# Altium PCB flight_controller.PcbDoc (part 1 of 2)
Units mm, origin at the board's own origin, x right, y up, seen from the top; angles counter-clockwise.
Board outline 59.18 x 59.23 mm, 4 copper layers (L1 (SIG), L2 (GND), L3 (PWR), L4 (SIG)), stack 1.586 mm thick; 122 components, 85 nets, 425 pads, 276 vias.
Unrouted connection lines stored in the file: 18.
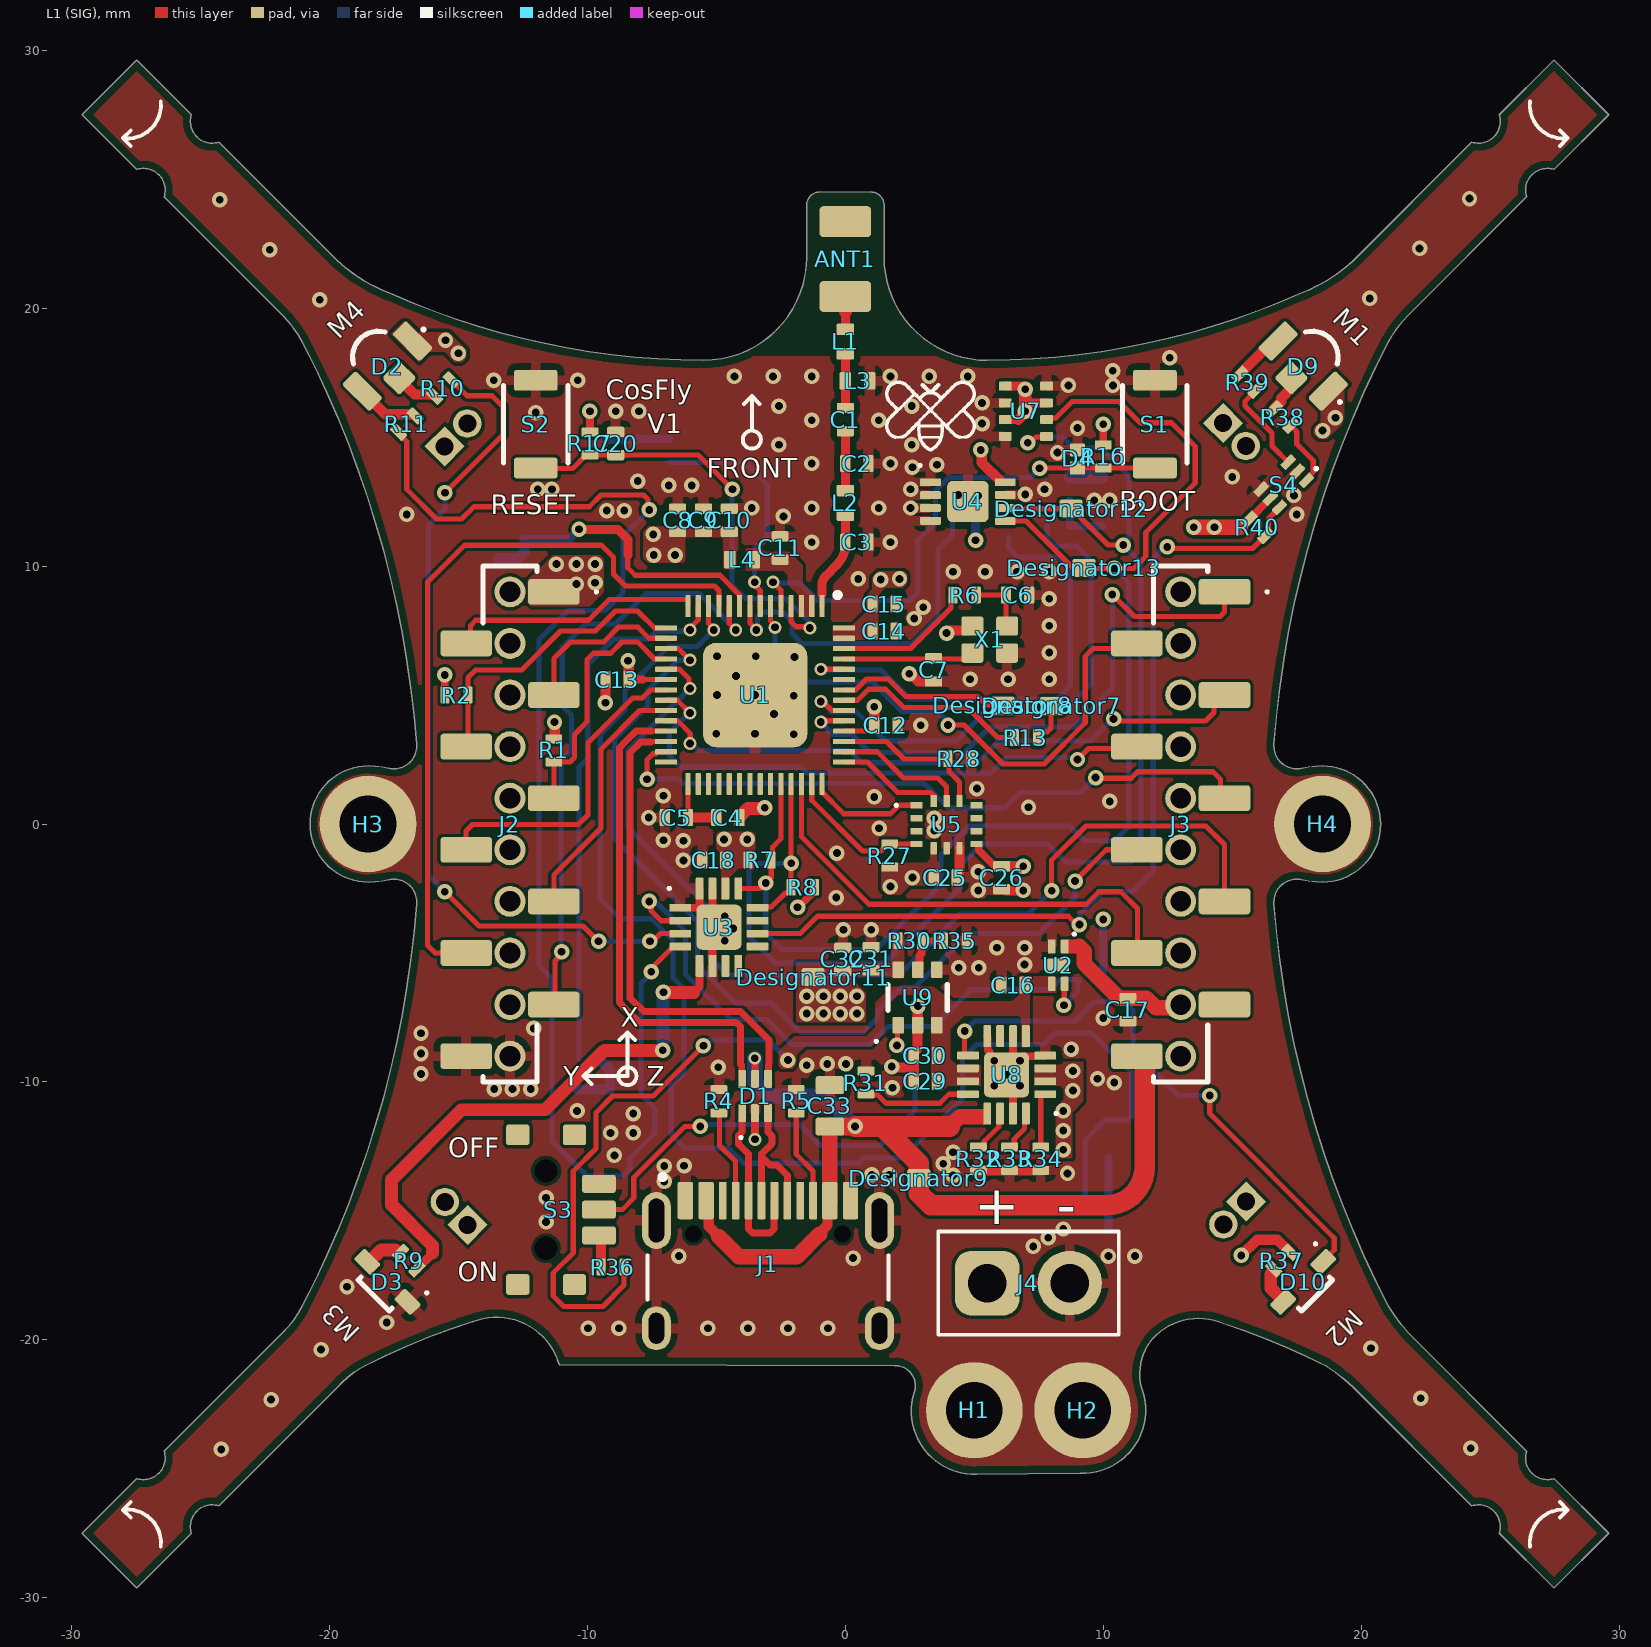
[diagram p0: L1 (SIG) view]
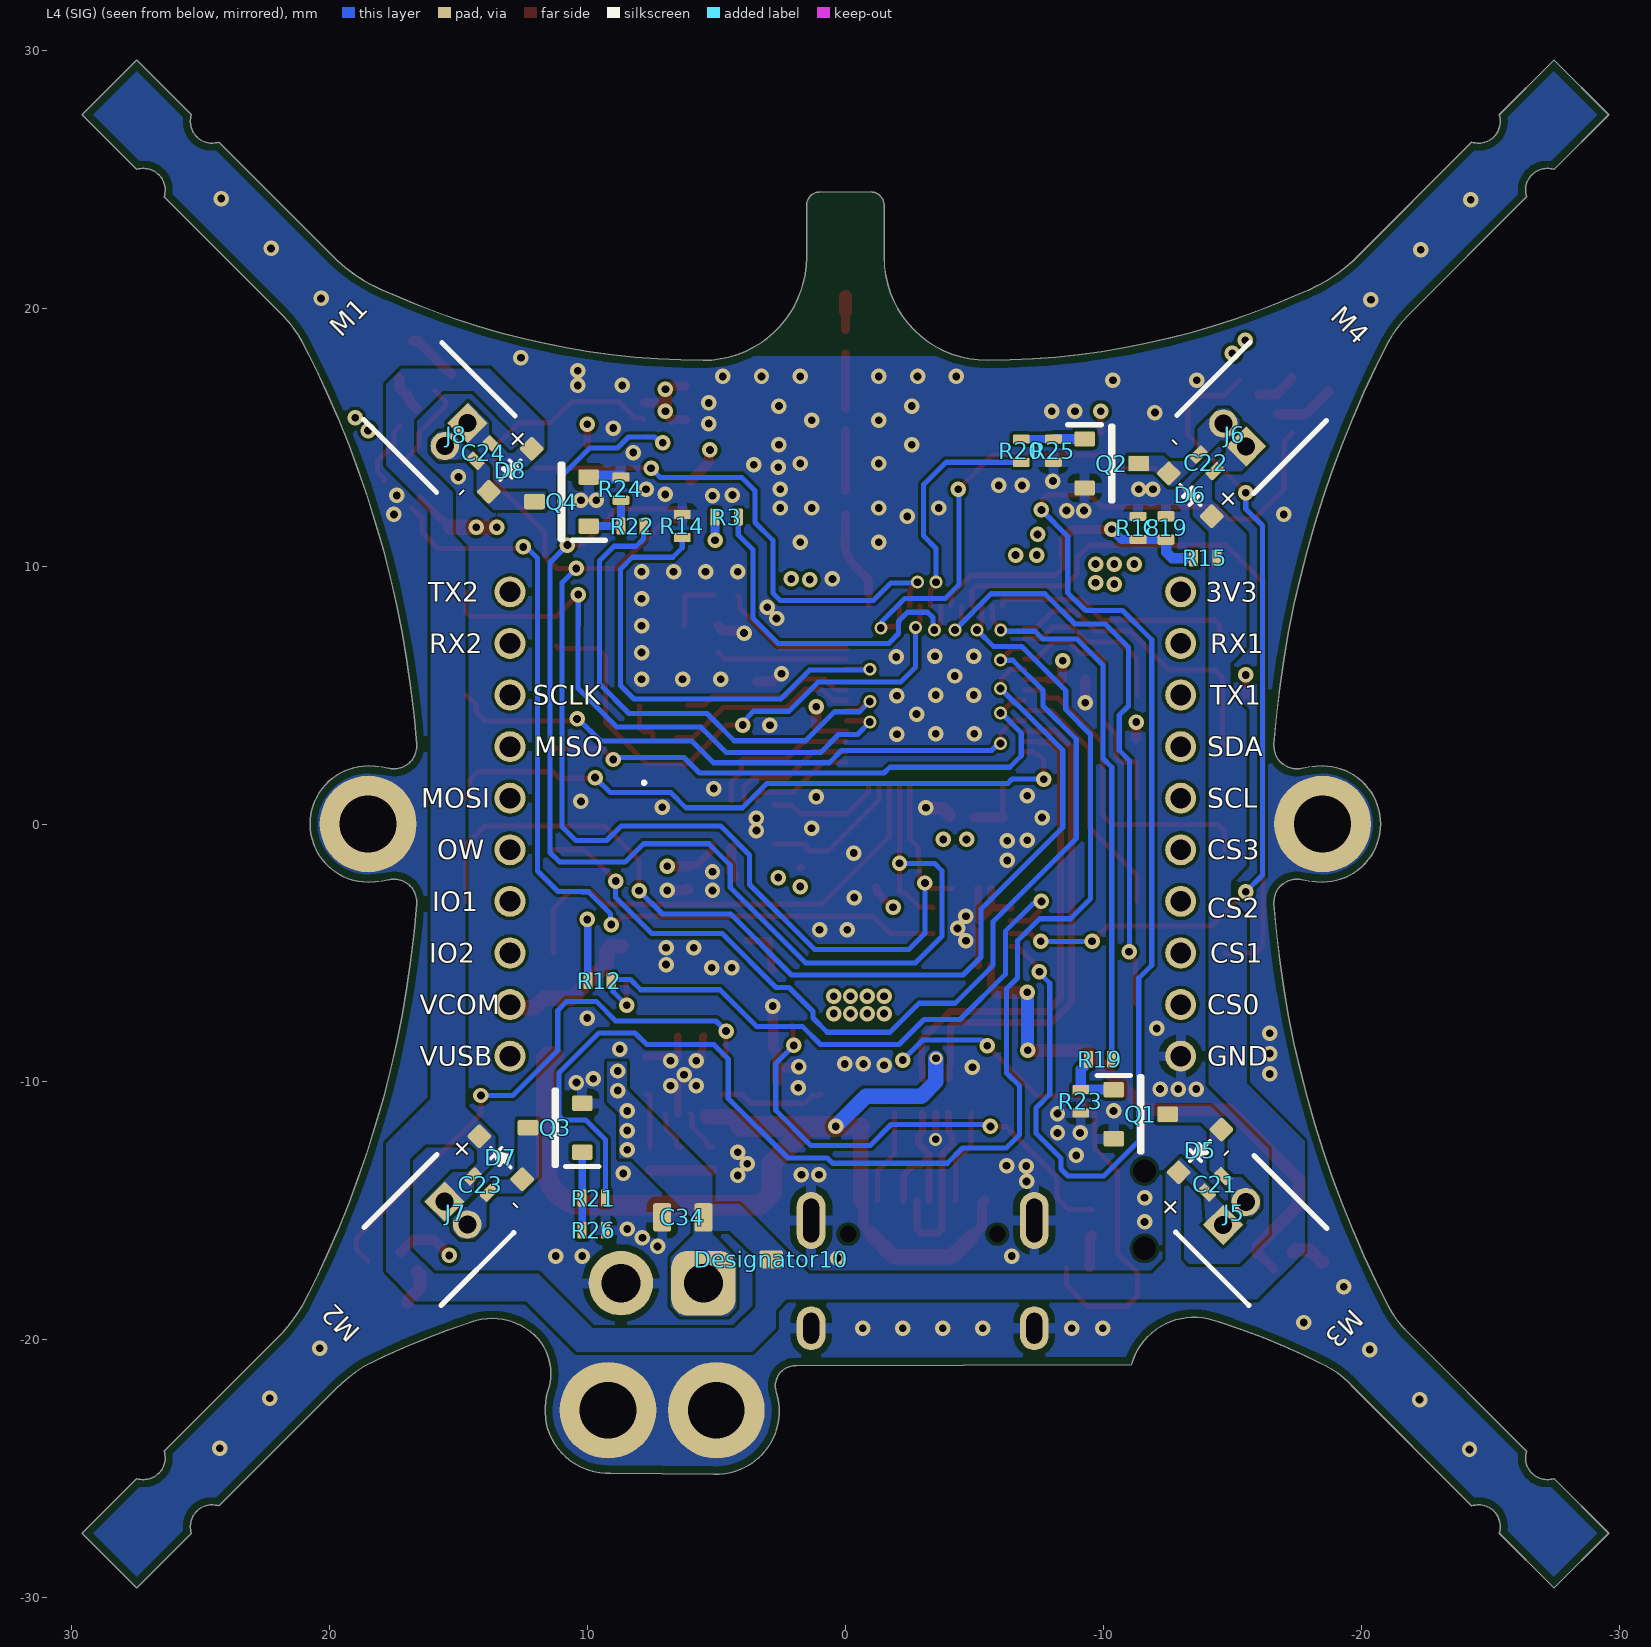
[diagram p1: L4 (SIG) view, seen from below]
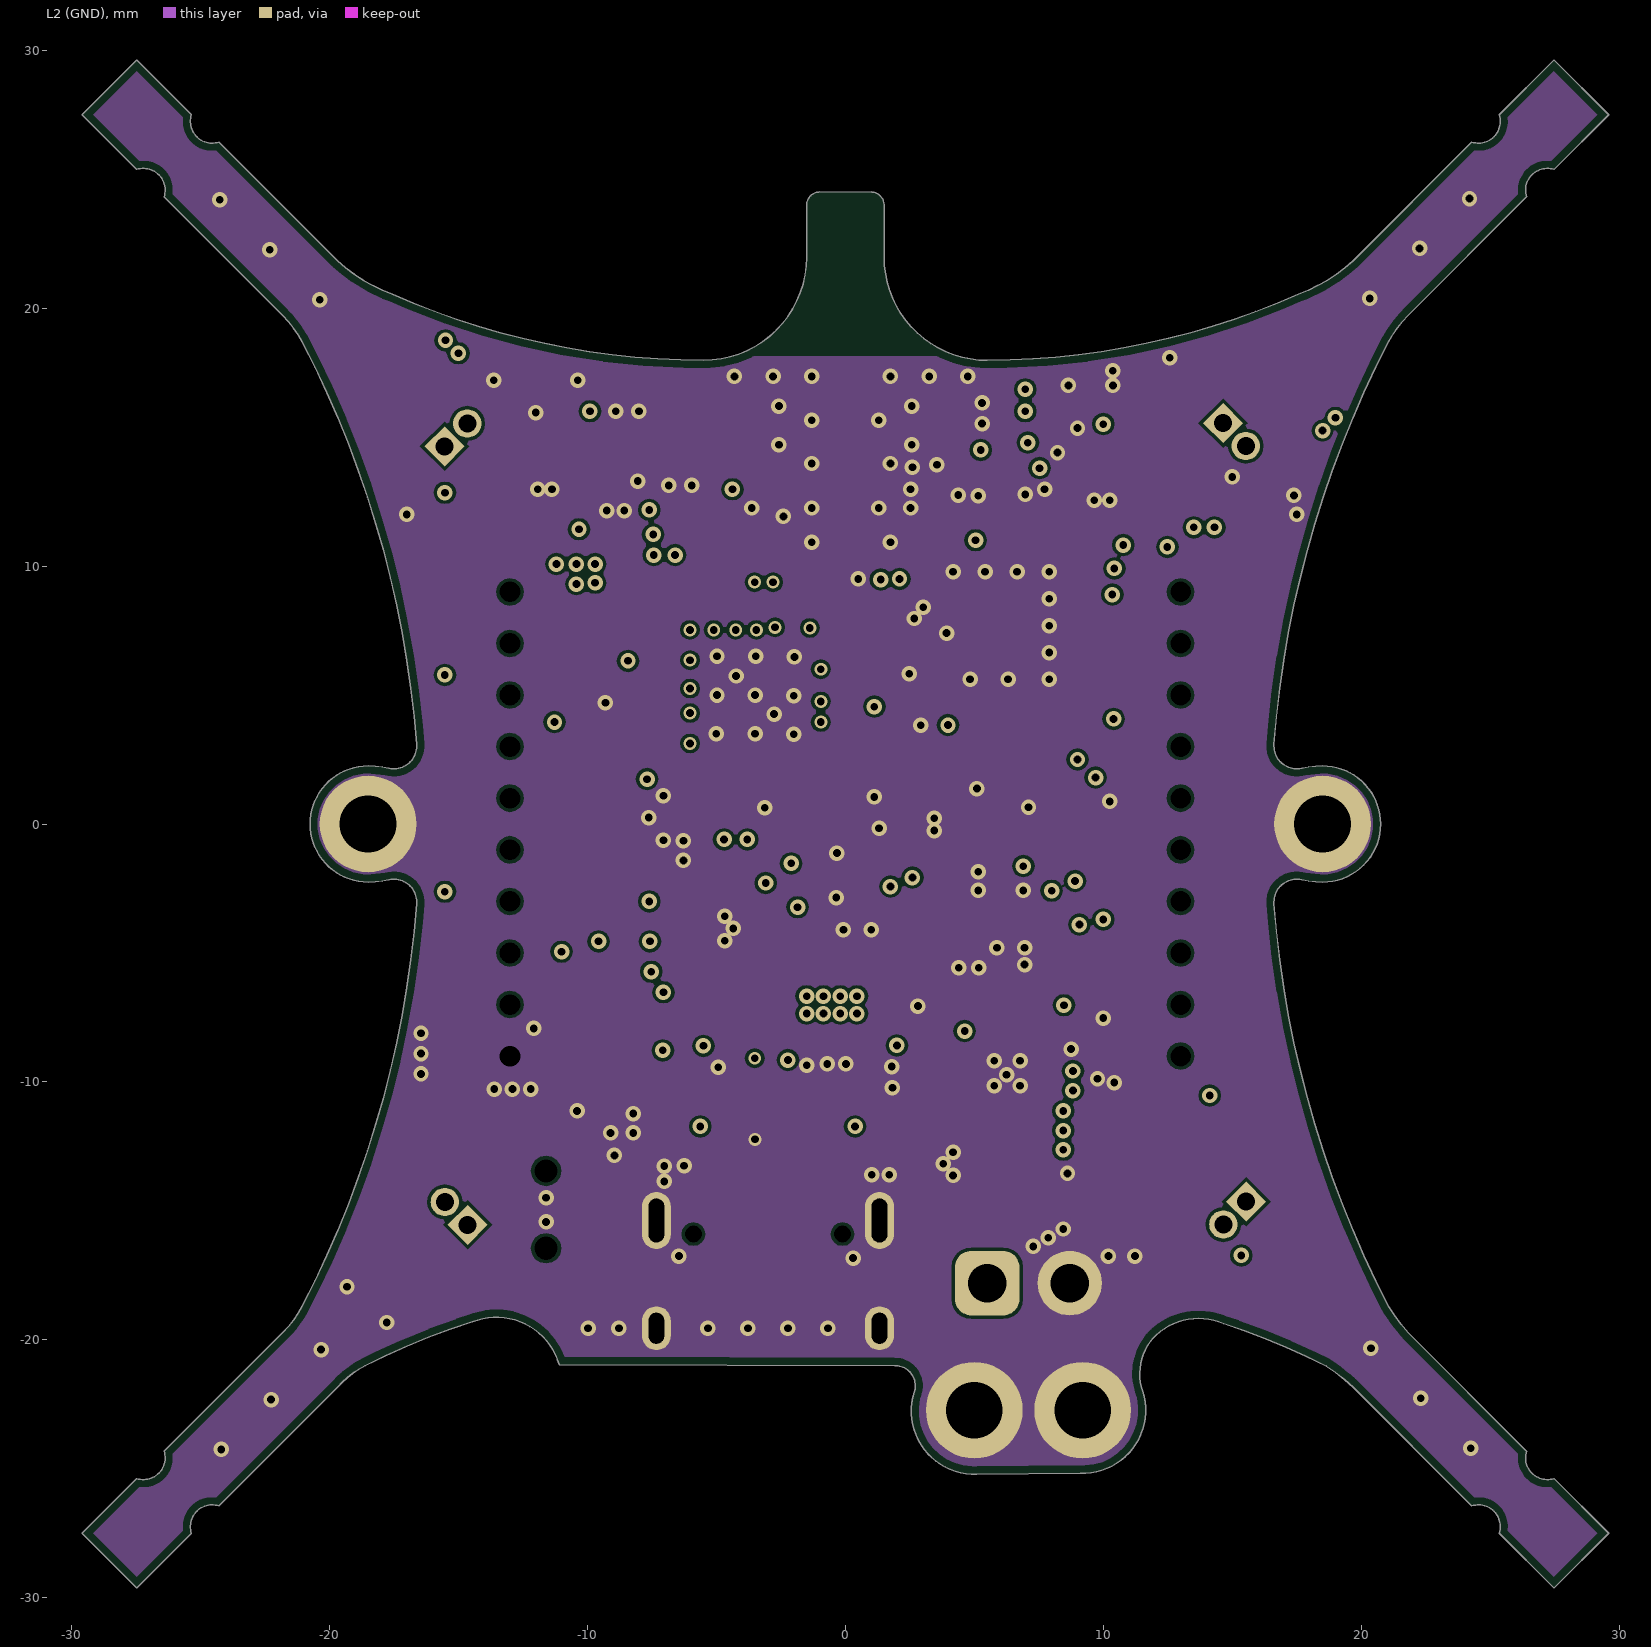
[diagram p2: L2 (GND)]
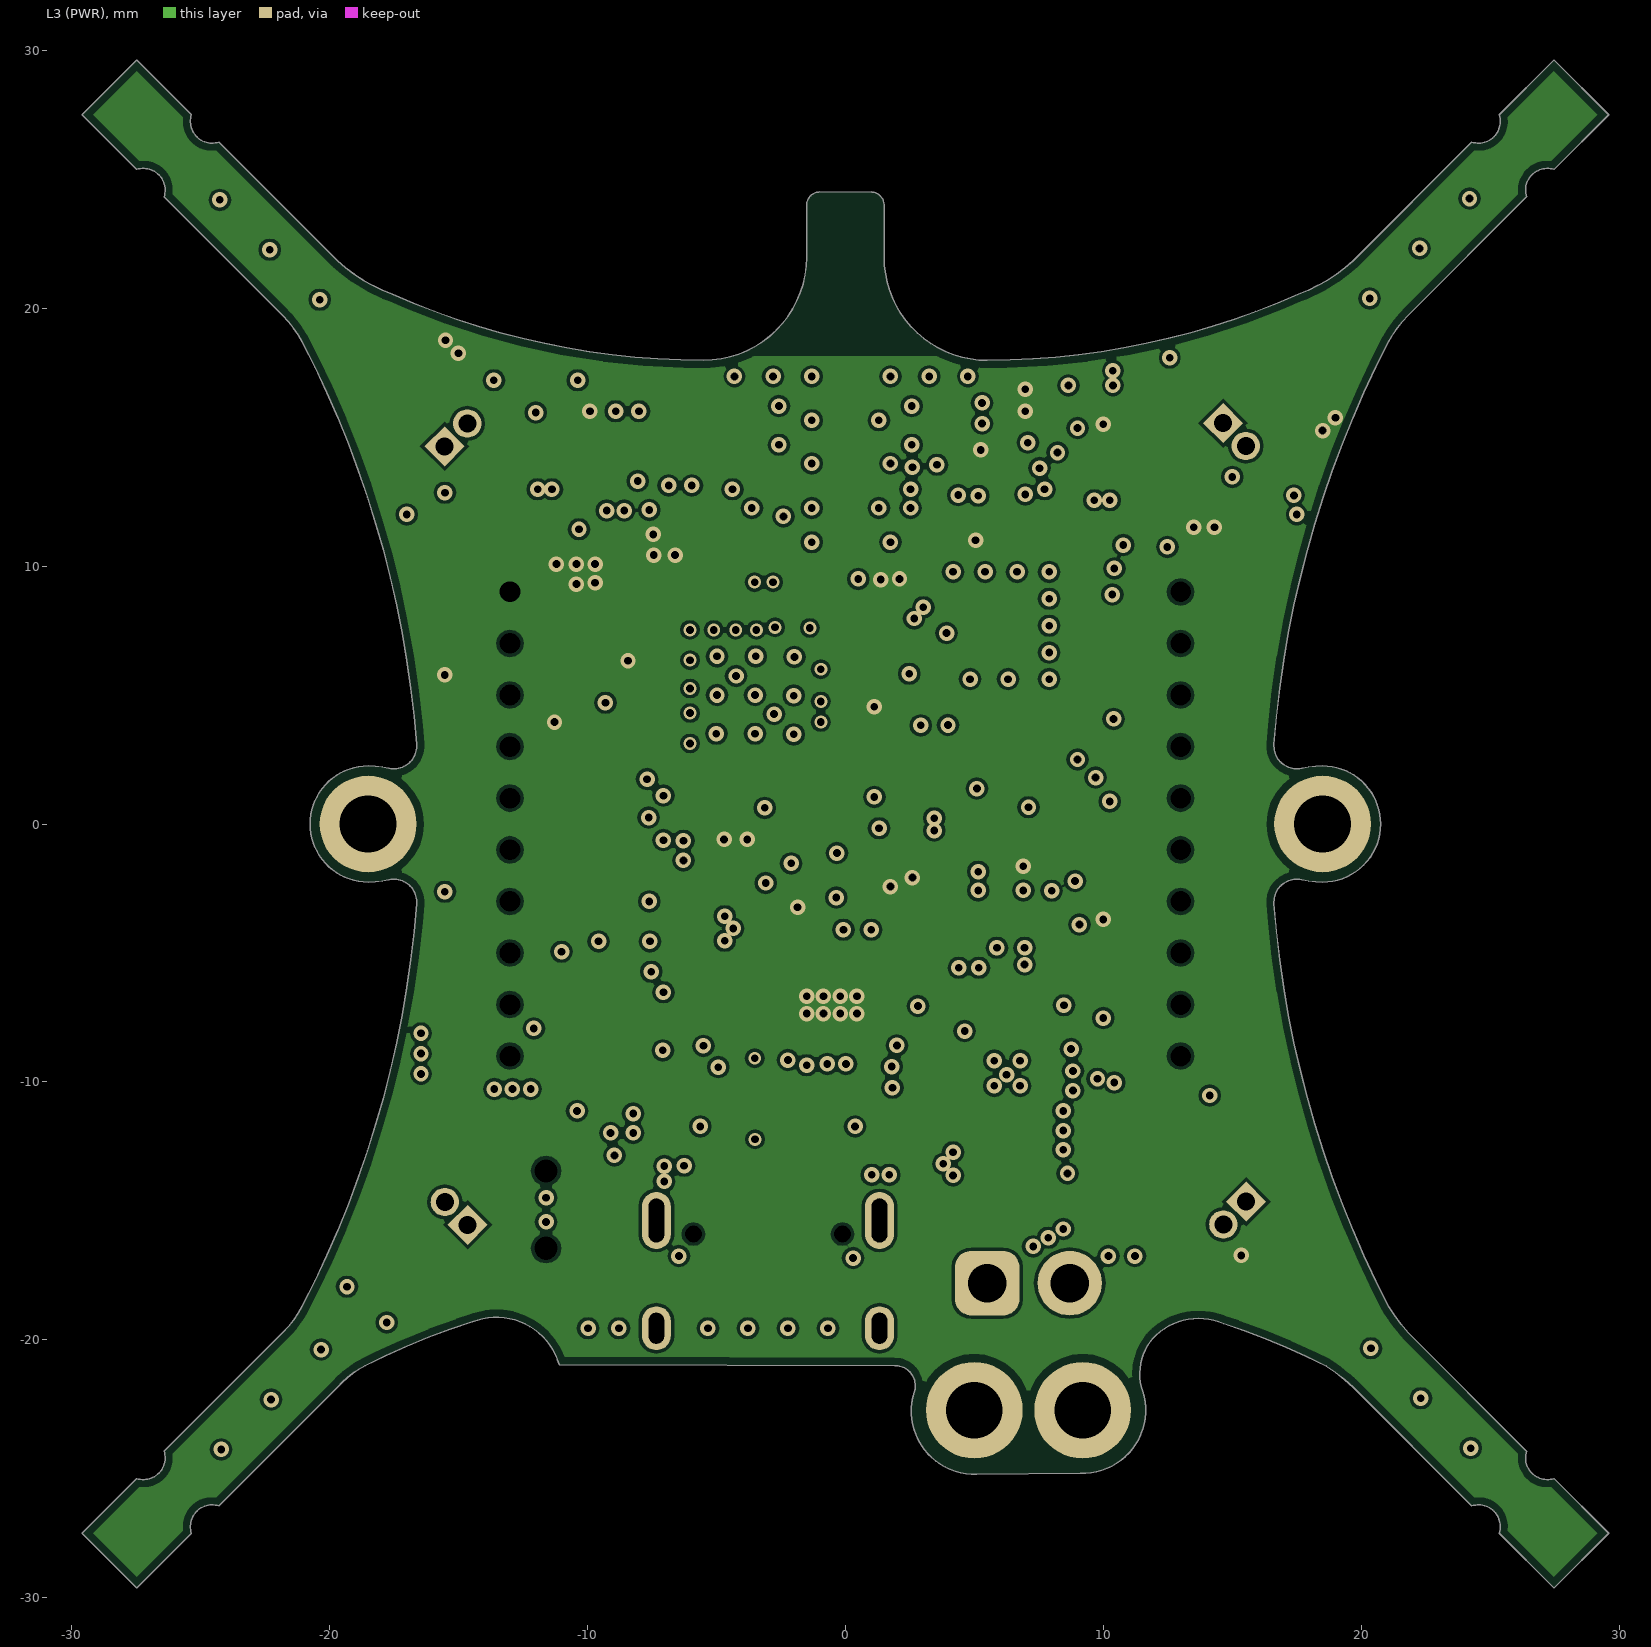
[diagram p3: L3 (PWR)]
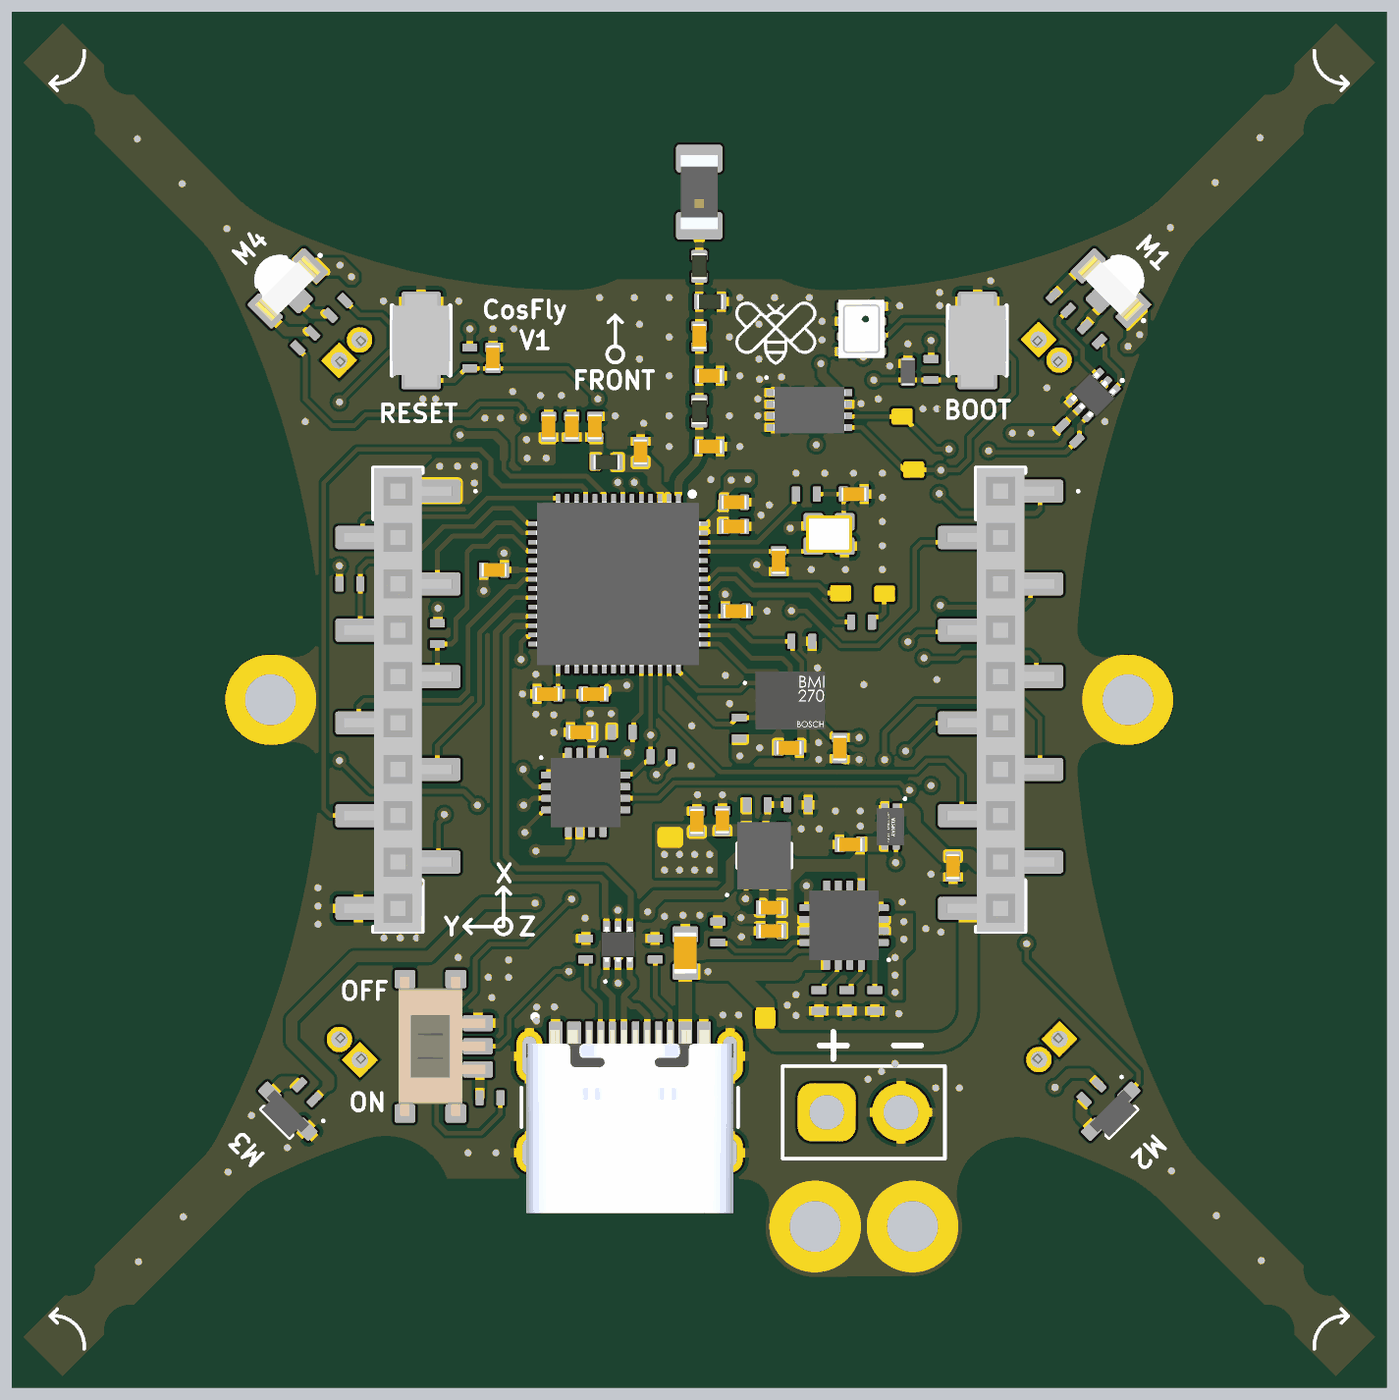
[diagram p5: 3D render of the assembled board from above, using the file's embedded part models]
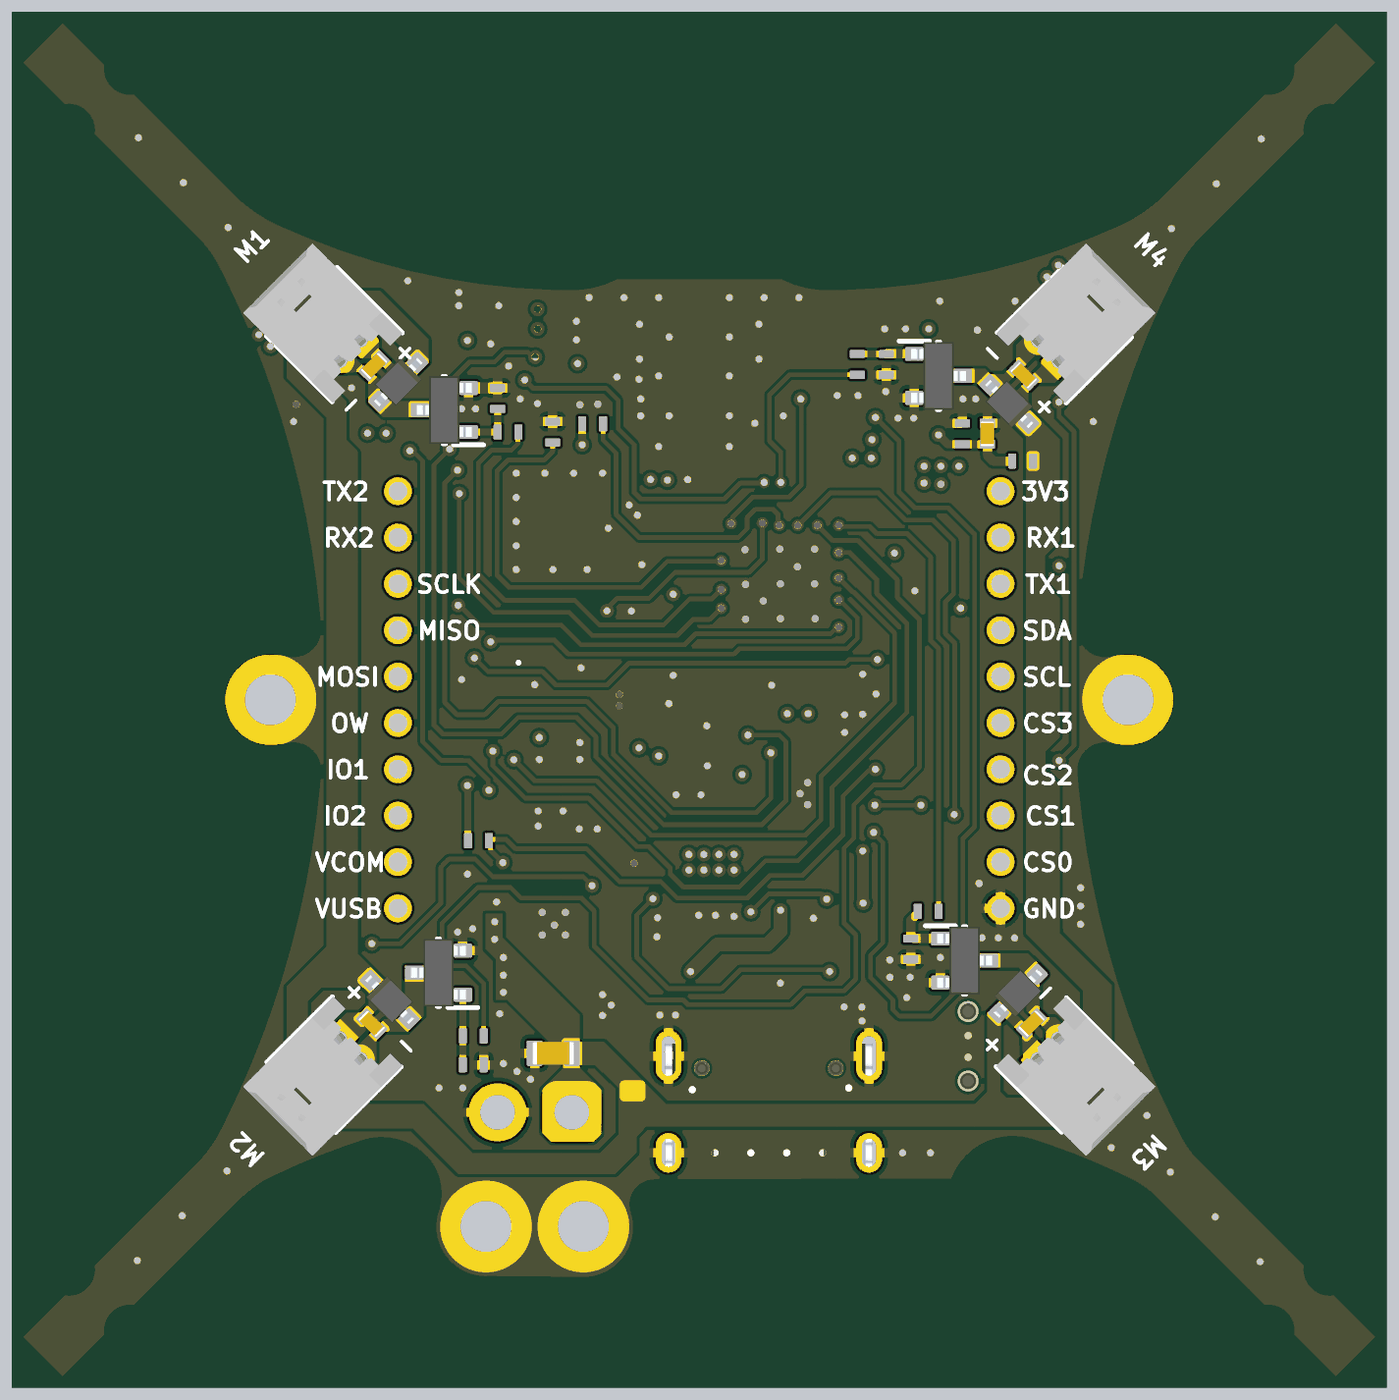
[diagram p6: 3D render of the assembled board from below, using the file's embedded part models]

## Layer stack, top to bottom
Top Solder: solder mask 0.0102, Solder Resist, Dk 3.5
L1 (SIG): signal copper 0.035
Dielectric 2: prepreg 0.2104, 7628, Dk 4.4
L2 (GND): signal copper 0.0152
Dielectric 1: dielectric 1.065, FR-4, Dk 4.6
L3 (PWR): signal copper 0.0152
Dielectric 3: prepreg 0.2104, 7628, Dk 4.4
L4 (SIG): signal copper 0.035
Bottom Solder: solder mask 0.0102, Solder Resist, Dk 3.5

## Board outline
-29.591,-27.495 -27.469,-29.616 -25.348,-27.495 cw(c-24.545,-27.237) -24.287,-26.434 -19.691,-21.838 cw(c-16.885,-24.322) -18.64,-21.011 cw(c-5.892,-46.18) -14.464,-19.3 cw(c-13.529,-21.656) -11.093,-20.956 -11.092,-20.955 1.908,-20.996 cw(c1.932,-21.775) 2.669,-22.027 ccw(c5,-22.761) 5.1,-25.202 9.1,-25.166 ccw(c9.2,-22.725) 11.531,-21.992 cw(c13.511,-21.306) 11.921,-19.94 cw(c13.702,-21.606) 14.662,-19.364 cw(c5.892,-46.18) 18.64,-21.011 cw(c14.94,-26.793) 19.691,-21.838 24.287,-26.434 cw(c24.545,-27.237) 25.348,-27.495 27.469,-29.616 29.591,-27.495 27.469,-25.374 cw(c27.211,-24.571) 26.409,-24.313 21.812,-19.717 cw(c27.087,-15.019) 21.047,-18.681 cw(c57.081,-0.016) 16.617,-3.099 cw(c17.502,-3.027) 17.692,-2.161 ccw(c18.508,1.513) 18.5,-2.25 ccw(c18.5,0) 20.75,0 ccw(c18.5,0) 18.5,2.25 ccw(c18.508,-1.513) 17.692,2.161 cw(c17.502,3.027) 16.617,3.099 cw(c57.081,0.016) 21.047,18.681 cw(c25.413,16.256) 21.812,19.717 26.409,24.313 cw(c27.211,24.571) 27.469,25.374 29.591,27.495 27.469,29.616 25.348,27.495 cw(c24.545,27.237) 24.287,26.434 19.691,21.838 cw(c15.333,26.588) 17.56,20.539 17.56,20.538 cw(c5.439,47.888) 5.502,17.973 cw(c5.503,21.973) 1.503,21.974 1.5,23.975 ccw(c0.988,23.988) 1,24.5 -1,24.5 -1,24.501 ccw(c-0.988,23.988) -1.5,23.976 -1.503,21.974 cw(c-5.503,21.973) -5.502,17.973 cw(c-5.439,47.888) -17.56,20.539 cw(c-15.333,26.588) -19.691,21.838 -24.287,26.434 cw(c-24.545,27.237) -25.348,27.495 -27.469,29.616 -29.591,27.495 -27.469,25.374 cw(c-27.211,24.571) -26.409,24.313 -21.812,19.717 cw(c-25.413,16.256) -21.047,18.681 cw(c-57.08,0.016) -16.617,3.099 cw(c-17.502,3.027) -17.692,2.161 ccw(c-18.508,-1.513) -18.5,2.25 ccw(c-18.5,0) -20.75,0 ccw(c-18.5,0) -18.5,-2.25 ccw(c-18.508,1.513) -17.692,-2.161 cw(c-17.502,-3.027) -16.617,-3.099 cw(c-57.081,-0.016) -21.047,-18.681 cw(c-24.47,-16.953) -21.812,-19.717 -26.409,-24.313 cw(c-27.211,-24.571) -27.469,-25.374

## Design rules (kind name [scope] priority, off if disabled: settings)
BoardOutlineClearance [All] p1: gap=0.3 ignorepadtopadclearanceinfootprint=FALSE except(0: Arc-SplitContinuation Track-SplitContinuation SMDPad-SplitContinuation THPad-SplitContinuation Via-SplitContinuation Fill-SplitContinuation Poly-SplitContinuation Region-SplitContinuation Text-SplitContinuation)
Clearance Clearance_ANT_GND [InNet('NetC1_2') or InNet('NetC1_1') or InNet('ESP_LNA') vs InNet('GND')] p1: gap=0.25 ignorepadtopadclearanceinfootprint=FALSE
Clearance Clearance_BMM150 [(InComponent('U6') AND IsPad) vs IsTrack] p2: gap=0 ignorepadtopadclearanceinfootprint=FALSE except(0.125: Via-Via Via-Fill Via-Poly Via-Region Via-Text Via-Hole Fill-Fill Fill-Poly Fill-Region Fill-Text Fill-Hole Poly-Poly Poly-Region Poly-Text Poly-Hole Region-Region Region-Text Region-Hole Text-Text Text-Hole)
Clearance Clearance_mounting_holes [OnLayer('L3 (PWR)') vs (Name = 'H1-1') or (Name = 'H2-1') or (Name = 'H3-1') or (Name = 'H4-1')] p3: gap=0.3 ignorepadtopadclearanceinfootprint=FALSE
Clearance Clearance_ALL [All] p4: gap=0.125 ignorepadtopadclearanceinfootprint=TRUE
Clearance Clearance_GND [All vs InNet('GND')] p5: gap=0.2 ignorepadtopadclearanceinfootprint=FALSE
DiffPairsRouting [All] p1: maxlimit=0.254 minlimit=0.15 mostfreqgap=0.254 toplayer_maxgap=0.15 toplayer_prefgap=0.15 toplayer_minwidth=0.15 toplayer_maxwidth=0.27 toplayer_prefwidth=0.27 bottomlayer_maxgap=0.15 bottomlayer_prefgap=0.15 bottomlayer_minwidth=0.15 bottomlayer_maxwidth=0.27 bottomlayer_prefwidth=0.27 impedanceprofiledriven=TRUE impedanceprofileid={EBC603E6-E350-48A5-98B1-5F12BB36354E} impedanceprofilevalue=90.000000 maxuncoupledlength=12.7
HoleToHoleClearance [All] p1: gap=0.125 allowstackedmicrovias=TRUE
MinimumSolderMaskSliver [All] p1: minsoldermaskwidth=0.001
PolygonConnect PolygonConnect_H [(Name = 'H1-1') or (Name = 'H2-1') or (Name = 'H3-1') or (Name = 'H4-1') vs InNet('GND')] p1: connectstyle=Direct reliefconductorwidth=0.254 reliefentries=4 polygonreliefangle="90 Angle" airgapwidth=0.254
PolygonConnect PolygonConnect_BATT_Relief [(OnBottomLayer or OnTopLayer) and (Name = 'J4-2') vs InNet('GND')] p2: connectstyle=Relief reliefconductorwidth=0.6 reliefentries=4 polygonreliefangle="90 Angle" airgapwidth=0.254
PolygonConnect PolygonConnect_GND [All vs (OnBottomLayer or OnTopLayer) and InNet('GND')] p3: thpad.connectstyle=Relief thpad.reliefconductorwidth=0.4 thpad.reliefentries=4 thpad.polygonreliefangle="90 Angle" thpad.airgapwidth=0.254 smdpad.connectstyle=Relief smdpad.reliefconductorwidth=0.4 smdpad.reliefentries=4 smdpad.polygonreliefangle="90 Angle" smdpad.airgapwidth=0.254 via.connectstyle=Direct via.reliefconductorwidth=0.254 via.reliefentries=4 via.polygonreliefangle="90 Angle" via.airgapwidth=0.254
PolygonConnect [All] p4: connectstyle=Direct reliefconductorwidth=0.254 reliefentries=4 polygonreliefangle="90 Angle" airgapwidth=0.254
RoutingVias [All] p1: holewidth=0.3 width=0.6 viastyle="Through Hole" minholewidth=0.2 minwidth=0.4 maxholewidth=0.3 maxwidth=0.6
SilkToSilkClearance [All] p1: silktosilkclearance=0.075
SilkToSolderMaskClearance [IsPad] p1: minsilkscreentomaskgap=0.075 clearancetoexposedcopper=TRUE
SolderMaskExpansion [All] p1: expansion=0.102 istentingtop=FALSE
SupplyNets "Schematic Supply Nets_2" [InNet('VBAT')] p1: voltage=0.000
SupplyNets "Schematic Supply Nets_5" [InNet('GND')] p2: voltage=0.000
SupplyNets "Schematic Supply Nets_4" [InNet('VDD_3v3')] p3: voltage=0.000
SupplyNets "Schematic Supply Nets_3" [InNet('VUSB')] p4: voltage=0.000
SupplyNets "Schematic Supply Nets" [InNet('VCOM')] p5: voltage=0.000
Width [All] p1: maxlimit=0.8 minlimit=0.15 preferedwidth=0.6 toplayer_prefwidth=0.2 bottomlayer_prefwidth=0.2 minimp=50.000000 maximp=50.000000 favimp=50.000000
25 further rules are at their usual default settings.

## Classes and differential pairs
component class pm: C29 C30 C31 C32 C33 C34 D9 D10 R30 R31 R32 R33 R34 R35 R36 R37 R38 R39 R40 S3 S4 U8 U9
differential pair class DIFF_USB: USB_D USB_D_IN
component class sensors: C25 C26 R27 R28 U5 U7
component class main: ANT1 C1 C2 C3 C4 C5 C6 C7 C8 C9 C10 C11 C12 C13 C14 C15 C16 C17 C18 C19 C20 C21 C22 C23 C24 C42 C43 D1 D2 D3 D4 D5 D6 D7 D8 H1 H2 H3 H4 J1 J2 J3 J4 J5 J6 J7 J8 L1 L2 L3 L4 Q1 Q2 Q3 Q4 R1 R2 R3 R4 R5 R6 R7 R8 R9 R10 R11 R12 R13 R14 R15 R16 R17 R18 R19 R20 R21 R22 R23 R24 R25 R26 R? S1 S2 U1 U2 U3 U4 X1
differential pair USB_D_IN: +USB_D_IN_P -USB_D_IN_N
differential pair USB_D: +USB_D_P -USB_D_N

## Components (designator, comment, footprint, x,y, rotation, side; value= is the part's Value field where it differs from the comment)
ANT1 "2450AT18B0100001E" ANTC3216X140N 0,21.9 r90 top
C1 "1.2pF" "0402 (1005 metric) CAP IPC-7351 Level B SMD" 0,15.675 r90 top
C2 "2.4pF" "0402 (1005 metric) CAP IPC-7351 Level B SMD" 0.45,13.975 r180 top
C3 "2.7pF" "0402 (1005 metric) CAP IPC-7351 Level B SMD" 0.45,10.925 r180 top
C4 "100nF" "0402 (1005 metric) CAP IPC-7351 Level B SMD" -4.55,0.25 r180 top
C5 "1uF" "0402 (1005 metric) CAP IPC-7351 Level B SMD" -6.55,0.25 r0 top
C6 "12pF" "0402 (1005 metric) CAP IPC-7351 Level B SMD" 6.675,8.875 r0 top
C7 "12pF" "0402 (1005 metric) CAP IPC-7351 Level B SMD" 3.425,5.975 r270 top
C8 "10uF" "0402 (1005 metric) CAP IPC-7351 Level B SMD" -6.5,11.775 r270 top
C9 "1uF" "0402 (1005 metric) CAP IPC-7351 Level B SMD" -5.5,11.775 r270 top
C10 "100nF" "0402 (1005 metric) CAP IPC-7351 Level B SMD" -4.5,11.775 r270 top
C11 "100nF" "0402 (1005 metric) CAP IPC-7351 Level B SMD" -2.53,10.7 r270 top
C12 "100nF" "0402 (1005 metric) CAP IPC-7351 Level B SMD" 1.575,3.825 r180 top
C13 "100nF" "0402 (1005 metric) CAP IPC-7351 Level B SMD" -8.85,5.6 r0 top
C14 "1uF" "0402 (1005 metric) CAP IPC-7351 Level B SMD" 1.5,7.475 r180 top
C15 "1nF" "0402 (1005 metric) CAP IPC-7351 Level B SMD" 1.5,8.525 r180 top
C16 "1uF" "0402 (1005 metric) CAP IPC-7351 Level B SMD" 6.5,-6.25 r0 top
C17 "100nF" "0402 (1005 metric) CAP IPC-7351 Level B SMD" 10.95,-7.2 r90 top
C18 "100nF" "0402 (1005 metric) CAP IPC-7351 Level B SMD" -5.1,-1.4 r0 top
C19 "100nF" "0402 (1005 metric) CAP IPC-7351 Level B SMD" -12.425,11.475 r270 bottom
C20 "1uF" "0402 (1005 metric) CAP IPC-7351 Level B SMD" -8.9,14.75 r270 top
C21 "100nF" "0402 (1005 metric) CAP IPC-7351 Level B SMD" -14.333,-13.966 r315 bottom
C22 "100nF" "0402 (1005 metric) CAP IPC-7351 Level B SMD" -14,14 r225 bottom
C23 "100nF" "0402 (1005 metric) CAP IPC-7351 Level B SMD" 14.137,-13.981 r45 bottom
C24 "100nF" "0402 (1005 metric) CAP IPC-7351 Level B SMD" 14.025,14.4 r135 bottom
C25 "100nF" "0402 (1005 metric) CAP IPC-7351 Level B SMD" 3.875,-2.075 r180 top
C26 "100nF" "0402 (1005 metric) CAP IPC-7351 Level B SMD" 6.062,-2.085 r90 top
C29 "4.7uF" "0402 (1005 metric) CAP IPC-7351 Level B SMD" 3.1,-9.975 r0 top
C30 "100nF" "0402 (1005 metric) CAP IPC-7351 Level B SMD" 3.1,-8.975 r0 top
C31 "10uF" "0402 (1005 metric) CAP IPC-7351 Level B SMD" 1,-5.225 r270 top
C32 "10uF" "0402 (1005 metric) CAP IPC-7351 Level B SMD" -0.1,-5.25 r270 top
C33 "4.7uF" "0603 (1608 metric) CAP IPC-7351 Level B SMD" -0.6,-10.925 r270 top
C34 "22uF" "0603 (1608 metric) CAP IPC-7351 Level B SMD" 6.3,-15.25 r180 bottom
D1 "USBLC6-2SC6" "USBLC6-2 SOT-666" -3.5,-10.55 r0 top
D2 "LTST-S326KGJRKT" LTST-S326KGJRKT -17.75,17.75 r135 top
D3 "IN-S85CS5B" INS85CS5B -17.75,-17.75 r225 top
D4 "PESDNC2FD3V3BS" PESDNC2FD3V3BS 9,14.15 r270 top
D5 "1N5817WS" SOD2613X110N -13.75,-12.675 r135 bottom
D6 "1N5817WS" SOD2613X110N -13.372,12.761 r45 bottom
D7 "1N5817WS" SOD2613X110N 13.357,-12.938 r225 bottom
D8 "1N5817WS" SOD2613X110N 12.987,13.713 r315 bottom
D9 "LTST-S326KGJRKT" LTST-S326KGJRKT 17.75,17.75 r45 top
D10 "IN-S85CS5B" INS85CS5B 17.75,-17.75 r315 top
Designator7 "Comment" "Test Pad"#1 8,4.575 r0 top
Designator8 "Comment" "Test Pad"#1 6.1,4.6 r0 top
Designator9 "Comment" "Test Pad"#1 2.85,-13.729 r0 top
Designator10 "Comment" "Test Pad"#1 2.875,-16.875 r180 bottom
Designator11 "Comment" "Test Pad"#2 -1.344,-5.75 r0 top
Designator12 "Comment" "Test Pad"#1 8.75,12.225 r0 top
Designator13 "Comment" "Test Pad"#1 9.25,9.925 r0 top
H1 "Mounting_Hole" Plated_Hole#1 5.1,-22.725 r0 top
H2 "Mounting_Hole" Plated_Hole#2 9.1,-22.725 r0 top
H3 "Mounting_Hole" Plated_Hole#3 -18.5,0 r0 top
H4 "Mounting_Hole" Plated_Hole#4 18,0 r0 top
J1 "TYPE-C-31-M-12" USB-C-31-M-12 -3,-17 r0 top locked
J2 "1-2307813-0" 123078130 -13,0 r270 top locked
J3 "1-2307813-0" 123078130 13,0 r270 top
J4 "Battery" Batt_pads 7.1,-17.8 r90 top
J5 "53048-0210" 53048-0210 -17.5,-17.5 r315 bottom
J6 "53048-0210" 53048-0210 -17.5,17.5 r225 bottom
J7 "53048-0210" 53048-0210 17.5,-17.5 r45 bottom
J8 "53048-0210" 53048-0210 17.5,17.5 r135 bottom
L1 "3.3nH" "0402 (1005 metric) IND IPC-7351 Level B SMD_" 0,18.7 r90 top
L2 "2.4nH" "0402 (1005 metric) IND IPC-7351 Level B SMD_" 0,12.45 r270 top
L3 "2.7nH" "0402 (1005 metric) IND IPC-7351 Level B SMD_" 0.475,17.175 r180 top
L4 "2nH" "0402 (1005 metric) IND IPC-7351 Level B SMD_" -4,10.25 r0 top
Q1 "SI2302DDS-T1-GE3" SOT95P237X112-3N -11.45,-11.25 r180 bottom
Q2 "SI2302DDS-T1-GE3" SOT95P237X112-3N -10.325,13.975 r180 bottom
Q3 "SI2302DDS-T1-GE3" SOT95P237X112-3N 11.25,-11.775 r0 bottom
Q4 "SI2302DDS-T1-GE3" SOT95P237X112-3N 11,12.5 r0 bottom
R1 "2.2kΩ" "0402 (1005 metric) RES IPC-7351 Level B SMD" -11.3,2.85 r90 top
R2 "2.2kΩ" "0402 (1005 metric) RES IPC-7351 Level B SMD" -15.075,5 r180 top
R3 "10kΩ" "0402 (1005 metric) RES IPC-7351 Level B SMD" 4.6,11.9 r0 bottom
R4 "5.1kΩ" "0402 (1005 metric) RES IPC-7351 Level B SMD" -4.9,-10.75 r270 top
R5 "5.1kΩ" "0402 (1005 metric) RES IPC-7351 Level B SMD" -1.9,-10.75 r270 top
R6 "22Ω" "0402 (1005 metric) RES IPC-7351 Level B SMD" 4.625,8.875 r180 top
R7 "2.2kΩ" "0402 (1005 metric) RES IPC-7351 Level B SMD" -3.325,-1.4 r180 top
R8 "2.2kΩ" "0402 (1005 metric) RES IPC-7351 Level B SMD" -1.65,-2.45 r0 top
R9 "620Ω" "0402 (1005 metric) RES IPC-7351 Level B SMD" -16.925,-16.925 r315 top
R10 "270Ω" "0402 (1005 metric) RES IPC-7351 Level B SMD" -15.6,16.9 r225 top
R11 "270Ω" "0402 (1005 metric) RES IPC-7351 Level B SMD" -17,15.5 r45 top
R12 "100kΩ" "0402 (1005 metric) RES IPC-7351 Level B SMD" 9.525,-6.075 r0 bottom
R13 "510Ω" "0402 (1005 metric) RES IPC-7351 Level B SMD" 7,3.35 r0 top
R14 "10kΩ" "0402 (1005 metric) RES IPC-7351 Level B SMD" 6.325,11.55 r90 bottom
R15 "200kΩ" "0402 (1005 metric) RES IPC-7351 Level B SMD" -13.95,10.3 r180 bottom
R16 "10kΩ" "0402 (1005 metric) RES IPC-7351 Level B SMD" 10,14.25 r90 top
R17 "10kΩ" "0402 (1005 metric) RES IPC-7351 Level B SMD" -9.9,14.75 r90 top
R18 "100kΩ" "0402 (1005 metric) RES IPC-7351 Level B SMD" -11.35,11.475 r270 bottom
R19 "47Ω" "0402 (1005 metric) RES IPC-7351 Level B SMD" -9.875,-9.125 r180 bottom
R20 "47Ω" "0402 (1005 metric) RES IPC-7351 Level B SMD" -6.819,14.472 r270 bottom
R21 "47Ω" "0402 (1005 metric) RES IPC-7351 Level B SMD" 9.75,-14.5 r180 bottom
R22 "47Ω" "0402 (1005 metric) RES IPC-7351 Level B SMD" 8.25,11.55 r180 bottom
R23 "10KΩ" "0402 (1005 metric) RES IPC-7351 Level B SMD" -9.125,-10.75 r90 bottom
R24 "10KΩ" "0402 (1005 metric) RES IPC-7351 Level B SMD" 8.7,13 r270 bottom
R25 "10KΩ" "0402 (1005 metric) RES IPC-7351 Level B SMD" -8.069,14.472 r90 bottom
R26 "10KΩ" "0402 (1005 metric) RES IPC-7351 Level B SMD" 9.75,-15.75 r0 bottom
R27 "4.7kΩ" "0402 (1005 metric) RES IPC-7351 Level B SMD" 1.725,-1.225 r270 top
R28 "4.7kΩ" "0402 (1005 metric) RES IPC-7351 Level B SMD" 4.425,2.525 r180 top
R30 "100kΩ" "0402 (1005 metric) RES IPC-7351 Level B SMD" 2.5,-4.525 r0 top
R31 "1kΩ" "0402 (1005 metric) RES IPC-7351 Level B SMD" 0.8,-10.025 r90 top
R32 "10kΩ" "0402 (1005 metric) RES IPC-7351 Level B SMD" 5.158,-12.975 r270 top
R33 "1kΩ" "0402 (1005 metric) RES IPC-7351 Level B SMD" 6.367,-12.975 r270 top
R34 "10kΩ" "0402 (1005 metric) RES IPC-7351 Level B SMD" 7.575,-12.975 r270 top
R35 "22.1kΩ" "0402 (1005 metric) RES IPC-7351 Level B SMD" 4.25,-4.525 r0 top
R36 "100kΩ" "0402 (1005 metric) RES IPC-7351 Level B SMD" -9.025,-17.175 r0 top
R37 "620Ω" "0402 (1005 metric) RES IPC-7351 Level B SMD" 16.925,-16.925 r45 top
R38 "270Ω" "0402 (1005 metric) RES IPC-7351 Level B SMD" 16.95,15.775 r135 top
R39 "270Ω" "0402 (1005 metric) RES IPC-7351 Level B SMD" 15.6,17.125 r135 top
R40 "10kΩ" "0402 (1005 metric) RES IPC-7351 Level B SMD" 15.975,11.5 r315 top
S1 "B3U-1000P" B3U-1000P 12,15.5 r270 top locked
S2 "B3U-1000P" B3U-1000P -12,15.5 r270 top locked
S3 "K3-1292M" K3-1292M -11.6,-14.95 r270 top locked
S4 "SN74LVC1G3157DRLR" SOTFL50P160X60-6N 17,13.15 r225 top
U1 "ESP32-S3FN8" ESP32-S3FN8 -3.5,5 r270 top locked
U2 "SIP32431DNP3-T1GE4" SON50P160X120X60-5N-D 8.25,-5.47 r270 top
U3 "PCA9534ARGTR" QFN50P300X300X100-17N-D -4.9,-4 r0 top locked
U4 "24AA64FT-I_MNY" SON50P300X200X80-9N-D 4.75,12.5 r0 top locked
U5 "BMI270" BMI270 3.925,-0.025 r0 top
U7 "BMP280" BMP280 7,16 r0 top locked
U8 "BQ24075QRGTRQ1" QFN50P300X300X100-17N-D 6.25,-9.725 r180 top locked
U9 "MUN3CAD01-SC" MUN3CAD01SC 2.8,-6.725 r90 top
X1 "40MHz" ECS4001037B2CKMTR 5.6,7.15 r180 top locked

## Footprints (in the part's own frame and the unit in brackets; to place one, negate y for a bottom-side part, rotate by r counter-clockwise, add the part's x,y. Pads: shape width x height; smd on the part's side, far side on the other; paste and mask are expansions set on the pad)
"0402 (1005 metric) CAP IPC-7351 Level B SMD" [mm] "0402 (1005 metric) footprint according to IPC-7351 Level B solder mask defined."
  rrect25% 0.4x0.66 smd: 1(-0.45,0) 2(0.45,0)
  body extent -0.55,-0.3 0.55,0.3, height 0.6
"0402 (1005 metric) IND IPC-7351 Level B SMD_" [mm]
  rrect25% 0.45x0.68 smd: 1(-0.475,0) 2(0.475,0)
  body extent -0.58,-0.33 0.58,0.33, height 0.65
"0402 (1005 metric) RES IPC-7351 Level B SMD" [mm] "0402 (1005 metric) footprint according to IPC-7351 Level B solder mask defined."
  rrect25% 0.35x0.65 smd mask+0.1: 1(-0.45,0) 2(0.45,0)
  body extent -0.53,-0.27 0.53,0.28, height 0.4
"0603 (1608 metric) CAP IPC-7351 Level B SMD" [mm]
  rrect25% 0.7x1.1 smd: 1(-0.8,0) 2(0.8,0)
  body extent -0.9,-0.5 0.9,0.5, height 1
53048-0210 [mm] "Molex 2 pin 1.25mm pitch"
  rect 1.1x1.1 hole 0.7: 1(0.635,-3.409)
  round 1.1 hole 0.7: 2(-0.615,-3.409)
  body extent -2.12,-4.53 2.13,0.97, height 3.6
123078130 [mm] "10 Pos 2mm SMD connector"
  round 1.2 / inner round 0.4 / far side round 1.2 hole 0.8: 1(-9,0) 2(-7,0) 3(-5,0) 4(-3,0) 5(-1,0) 6(1,0) 7(3,0) 8(5,0) 9(7,0) 10(9,0)
  rrect25% 1x2 smd: 1(-9,1.7) 2(-7,-1.7) 3(-5,1.7) 4(-3,-1.7) 5(-1,1.7) 6(1,-1.7) 7(3,1.7) 8(5,-1.7) 9(7,1.7) 10(9,-1.7)
  silkscreen extent -10,-1.05 10,3.4, body extent -10,-2.33 10,2.33, height 4.65
ANTC3216X140N [mm]
  rrect25% 1.2x2 smd: 1(-1.45,0) 2(1.45,0)
  body extent -1.6,-0.8 1.6,0.8, height 1.4
B3U-1000P [mm]
  rrect25% 0.8x1.7 smd: 1(1.7,0) 2(-1.7,0)
  silkscreen extent -1.5,-1.25 1.5,1.25, body extent -2,-1.25 2,1.25, height 1.6
Batt_pads [mm]
  rrect50% 2.5x2.5 hole 1.5 mask+0.1: 1(0,1.6)
  round 2.5 hole 1.5 mask+0.1: 2(0,-1.6)
  silkscreen extent -2,-3.5 2,3.5
BMI270 [mm]
  rrect25% 0.475x0.25 smd mask+0.1: 1(-1.163,0.75) 2(-1.163,0.25) 3(-1.163,-0.25) 4(-1.163,-0.75) 8(1.162,-0.75) 9(1.162,-0.25) 10(1.162,0.25) 11(1.162,0.75)
  rrect25% 0.25x0.475 smd mask+0.1: 5(-0.5,-0.913) 6(0,-0.913) 7(0.5,-0.913) 12(0.5,0.913) 13(0,0.913) 14(-0.5,0.913)
  silkscreen extent -2,0.7 -1.9,0.8, body extent -1.5,-1.25 1.5,1.25, height 0.85
BMP280 [mm]
  rrect25% 0.5x0.35 smd: 1(0.8,0.975) 2(0.8,0.325) 3(0.8,-0.325) 4(0.8,-0.975) 5(-0.8,-0.975) 6(-0.8,-0.325) 7(-0.8,0.325) 8(-0.8,0.975)
  body extent -1,-1.25 1,1.25, height 1
ECS4001037B2CKMTR [mm]
  rrect25% 0.85x0.75 smd: 1(-0.675,-0.525) 2(0.675,-0.525) 3(0.675,0.525) 4(-0.675,0.525)
  body extent -1,-0.8 1,0.8, height 0.5
ESP32-S3FN8 [mm]
  rrect25% 0.85x0.2 smd: 1(-3.45,2.6) 2(-3.45,2.2) 3(-3.45,1.8) 4(-3.45,1.4) 5(-3.45,1) 6(-3.45,0.6) 7(-3.45,0.2) 8(-3.45,-0.2) 9(-3.45,-0.6) 10(-3.45,-1) 11(-3.45,-1.4) 12(-3.45,-1.8) 13(-3.45,-2.2) 14(-3.45,-2.6) 29(3.45,-2.6) 30(3.45,-2.2) 31(3.45,-1.8) 32(3.45,-1.4) 33(3.45,-1) 34(3.45,-0.6) 35(3.45,-0.2) 36(3.45,0.2) 37(3.45,0.6) 38(3.45,1) 39(3.45,1.4) 40(3.45,1.8) 41(3.45,2.2) 42(3.45,2.6)
  rrect25% 0.2x0.85 smd: 15(-2.6,-3.45) 16(-2.2,-3.45) 17(-1.8,-3.45) 18(-1.4,-3.45) 19(-1,-3.45) 20(-0.6,-3.45) 21(-0.2,-3.45) 22(0.2,-3.45) 23(0.6,-3.45) 24(1,-3.45) 25(1.4,-3.45) 26(1.8,-3.45) 27(2.2,-3.45) 28(2.6,-3.45) 43(2.6,3.45) 44(2.2,3.45) 45(1.8,3.45) 46(1.4,3.45) 47(1,3.45) 48(0.6,3.45) 49(0.2,3.45) 50(-0.2,3.45) 51(-0.6,3.45) 52(-1,3.45) 53(-1.4,3.45) 54(-1.8,3.45) 55(-2.2,3.45) 56(-2.6,3.45)
  rrect25% 4.05x4.05 smd: 57(0,0)
  silkscreen extent -3.97,3.1 -3.78,3.3, body extent -3.55,-3.55 3.55,3.55, height 0.9
INS85CS5B [mm]
  rrect25% 0.6x0.9 smd: 1(0,1.1) 2(0,-1.1)
  silkscreen extent -0.83,-0.85 0.75,1.43, body extent -0.25,-1.05 0.75,1.05, height 0.8
K3-1292M [mm] "1P2T ultra-small (surface-mount) toggle switch"
  rrect25% 0.7x1.3 smd: 1(-1,2.05) 2(0,2.05) 3(1,2.05)
  round 0.45 hole 0.9 unplated: MH1(-1.5,0) MH2(1.5,0)
  rrect25% 0.8x0.9 smd: MP1(-2.9,1.1) MP2(2.9,1.1) MP3(2.9,-1.1) MP4(-2.9,-1.1)
  body extent -3,-1.38 3,2.37, height 2.2
LTST-S326KGJRKT [mm]
  rrect25% 1.5x0.75 smd: 1(0,-1.375) 3(0,1.375)
  rrect25% 0.95x0.95 smd: 2(-0.65,0)
  silkscreen extent 0,-2 1.5,0.87, body extent -0.5,-1.5 1.5,1.5, height 1
MUN3CAD01SC [mm]
  rrect25% 0.65x0.45 smd: 1(-1.075,0.75) 2(-1.075,0) 3(-1.075,-0.75) 4(1.075,-0.75) 5(1.075,0) 6(1.075,0.75)
  silkscreen extent -1.75,-1.15 0.5,1.65, body extent -1.45,-1.15 1.45,1.15, height 1.15
PESDNC2FD3V3BS [mm]
  rrect25% 0.5x0.6 smd: 1(-0.35,0) 2(0.35,0)
  body extent -0.55,-0.31 0.55,0.31, height 0.6
Plated_Hole#1 [mm] "2.2mm diameter"
  round 3.75 hole 2.2: 1(-0.1,0)
Plated_Hole#2 [mm] "2.2mm diameter"
  round 3.75 hole 2.2: 1(0.1,0)
Plated_Hole#3 [mm] "2.2mm diameter"
  round 3.75 hole 2.2: 1(0,0)
Plated_Hole#4 [mm] "2.2mm diameter"
  round 3.75 hole 2.2: 1(0.5,0)
QFN50P300X300X100-17N-D [mm]
  rrect25% 0.85x0.3 smd: 1(-1.5,0.75) 2(-1.5,0.25) 3(-1.5,-0.25) 4(-1.5,-0.75) 9(1.5,-0.75) 10(1.5,-0.25) 11(1.5,0.25) 12(1.5,0.75)
  rrect25% 0.3x0.85 smd: 5(-0.75,-1.5) 6(-0.25,-1.5) 7(0.25,-1.5) 8(0.75,-1.5) 13(0.75,1.5) 14(0.25,1.5) 15(-0.25,1.5) 16(-0.75,1.5)
  rrect25% 1.75x1.75 smd: 17(0,0)
  silkscreen extent -1.97,1.45 -1.88,1.55, body extent -1.5,-1.5 1.5,1.5, height 1
SOD2613X110N [mm]
  rrect25% 0.7x0.7 smd: 1(-1.175,0) 2(1.175,0)
  silkscreen extent -0.55,-0.3 0.55,0.3, body extent -1.33,-0.65 1.33,0.65, height 1.1
SON50P160X120X60-5N-D [mm]
  rrect25% 0.55x0.3 smd: 1(-0.725,0.25) 2(-0.725,-0.25) 3(0.725,-0.25) 4(0.725,0.25)
  rrect25% 0.5x0.86 smd: 5(0,0)
  silkscreen extent -1.25,0.58 -1.15,0.67, body extent -0.8,-0.6 0.8,0.6, height 0.6
SON50P300X200X80-9N-D [mm]
  rrect25% 0.8x0.3 smd: 1(-1.45,0.75) 2(-1.45,0.25) 3(-1.45,-0.25) 4(-1.45,-0.75) 5(1.45,-0.75) 6(1.45,-0.25) 7(1.45,0.25) 8(1.45,0.75)
  rrect25% 1.6x1.6 smd: 9(0,0)
  silkscreen extent -1.9,1.35 -1.8,1.45, body extent -1.55,-1 1.55,1, height 0.8
SOT95P237X112-3N [mm]
  rrect25% 0.8x0.6 smd: 1(-1.05,0.95) 2(-1.05,-0.95) 3(1.05,0)
  silkscreen extent -1.7,-1.46 0.05,1.5, body extent -1.18,-1.46 1.18,1.46, height 1.12
SOTFL50P160X60-6N [mm]
  rrect25% 0.6x0.3 smd: 1(-0.74,0.5) 2(-0.74,0) 3(-0.74,-0.5) 4(0.74,-0.5) 5(0.74,0) 6(0.74,0.5)
  body extent -0.8,-0.8 0.8,0.8, height 0.6
"Test Pad"#1 [mm] "Size of 1005[0402] resistor pad size"
  rrect25% 0.9x0.7 smd paste-2539.97: 1(0,0)
"Test Pad"#2 [mm] "Size of 1005[0402] resistor pad size"
  rrect25% 0.9x0.7 smd paste-2539.97: 1(0.094,-0.189)
USB-C-31-M-12 [mm]
  round 0 hole 0.65: 17(-2.89,1.102) 18(2.89,1.102)
  rrect25% 0.6x1.448 smd paste+0 mask+0.1: A1-B12(-3.2,2.4) A4-B9(-2.4,2.4) B1-A12(3.2,2.4) B4-A9(2.4,2.4)
  rrect25% 0.305x1.448 smd paste+0 mask+0.1: A5(-1.25,2.4) A6(-0.25,2.4) A7(0.25,2.4) A8(1.25,2.4) B5(1.75,2.4) B6(0.75,2.4) B7(-0.75,2.4) B8(-1.75,2.4)
  oval 1.118x1.702 hole 0.61 slot 1.194 at 90 deg: SHD(-4.325,-2.548) SHD(4.325,-2.548)
  oval 1.118x2.21 hole 0.61 slot 1.702 at 90 deg: SHD(-4.325,1.632) SHD(4.325,1.632)
  silkscreen extent -4.67,-1.44 4.67,3.42, body extent -4.47,-5.15 4.47,2.76, height 3.31
"USBLC6-2 SOT-666" [mm]
  rrect25% 0.3x0.7 smd: 1(-0.5,-0.66) 2(0,-0.66) 3(0.5,-0.66) 4(0.5,0.66) 5(0,0.66) 6(-0.5,0.66)
  silkscreen extent -0.6,-1.65 -0.5,-1.55, body extent -0.75,-0.75 0.75,0.75, height 0.46

## Part data
ANT1: "RF ANTENNA Chip Solder Surface Mount ,2.4GHz ~ 2.5GHz ,2 W", Manufacturer_Name="JOHANSON TECHNOLOGY", Datasheet Link=https://www.johansontechnology.com/docs/3829/Antenna-2450AT18B0100001E-Rev5.0_uMmswfC.pdf, Geometry.Height=1.4mm, Manufacturer_Part_Number=2450AT18B0100001E
C1 C2 C3 C4 C5 C6 C7 C8 C9 C10 C11 C12 C13 C14 C15 C16 C17 C18 C19 C20 C21 C22 C23 C24 C25 C26 C29 C30 C31 C32 C33 C34: library part "Capacitor Type1"
D1: "TVS Diode Array Uni-Directional USBLC6-2SC6 17V, SOT-23 6-Pin", Manufacturer_Name=STMicroelectronics, Mouser Part Number=511-USBLC6-2SC6, Datasheet Link=https://www.st.com/resource/en/datasheet/usblc6-2.pdf, Geometry.Height=1.45mm, Manufacturer_Part_Number=USBLC6-2SC6, Mouser Price/Stock=https://www.mouser.co.uk/ProductDetail/STMicroelectronics/USBLC6-2SC6?qs=po45yt2pPpu%2FhNIlwQdTlg%3D%3D
D2 D9: "Red / Green standard LED", Manufacturer_Name=Lite-On, Mouser Part Number=859-LTST-S326KGJRKT, Arrow Part Number=LTST-S326KGJRKT, Arrow Price/Stock=https://www.arrow.com/en/products/ltst-s326kgjrkt/lite-on-technology.html?utm_currency=USD&region=nac, Datasheet Link=http://optoelectronics.liteon.com/upload/download/DS22-2000-287/LTST-S326KGJRKT.pdf, Manufacturer_Part_Number=LTST-S326KGJRKT, Mouser Price/Stock=https://www.mouser.co.uk/ProductDetail/Lite-On/LTST-S326KGJRKT?qs=sXYjIdLHthxXAK%252B5bY%252BGww%3D%3D
D3 D10: "Standard LEDs - SMD Blue LED", Manufacturer_Name=Inolux, Mouser Part Number=743-IN-S85CS5B, Datasheet Link=https://www.inolux-corp.com/datasheet/SMDLED/Mono%20Color%20Side%20View/IN-S85CS5B_V1.0.pdf, Geometry.Height=0.7mm, Manufacturer_Part_Number=IN-S85CS5B, Mouser Price/Stock=https://www.mouser.co.uk/ProductDetail/Inolux/IN-S85CS5B?qs=stqOd1AaK79rJ2RZKPoGSg%3D%3D
D4: "Bottom ViewEM/CM/EMS Only", Manufacturer_Name=Prisemi, Datasheet Link=https://datasheet.lcsc.com/lcsc/2003172139_Shanghai-Prisemi-Elec-PESDNC2FD3V3BS_C496536.pdf, Geometry.Height=0.498mm, Manufacturer_Part_Number=PESDNC2FD3V3BS
D5 D6 D7 D8: "Diode 20V 1A Surface Mount SOD-323", Manufacturer_Name="Guandong AK Semiconductor", Datasheet Link=https://atlas.eefcdn.com/partdatasheet/666677/666677_35638466_1757293714069.pdf, Geometry.Height=1.1mm, Manufacturer_Part_Number=1N5817WS
J1: "Description", Manufacturer_Name="HRO Electronics", Copyright="Copyright (C) 2025 Ultra Librarian. All rights reserved.", Manufacturer_Part_Number=TYPE-C-31-M-12, RefDes=RefDes, Type=Type
J2 J3: "Board to Board & Mezzanine Connectors 10P,2MM,BB,REC,SRVT,SMD,0.1AU,TR,W/CP"
J4: library part Battery_conn
J5 J6 J7 J8: "1.25mm Pitch, PicoBlade PCB Header, Single Row, Right-Angle, Surface Mount, Tin (Sn) Plating, Friction Lock, 2 Circuits, Natural, Tape and Reel", Manufacturer_Name="Molex Connector Corporation", Copyright="Copyright (C) 2025 Ultra Librarian. All rights reserved.", Manufacturer_Part_Number=53048-0210, RefDes=RefDes, Type=Type
L1 L2 L3 L4: library part "Inductor Type1"
Q1 Q2 Q3 Q4: "SI2302DDS-T1-GE3 N-Channel MOSFET, 2.6 A, 20 V, 3-Pin SOT-363 Vishay", Manufacturer_Name=Vishay, Mouser Part Number=78-SI2302DDS-T1-GE3, Datasheet Link=http://www.vishay.com/docs/63653/si2302dds.pdf, Geometry.Height=1.12mm, Manufacturer_Part_Number=SI2302DDS-T1-GE3, Mouser Price/Stock=https://www.mouser.co.uk/ProductDetail/Vishay-Semiconductors/SI2302DDS-T1-GE3?qs=MxnWX8BLHKdaCSNWhg%252BxLA%3D%3D
R1 R2 R3 R4 R5 R6 R7 R8 R9 R10 R11 R12 R13 R14 R15 R16 R17 R18 R19 R20 R21 R22 R23 R24 R25 R26 R27 R28 R30 R31 R32 R33 R34 R35 R36 R37 R38 R39 R40: library part "Resistor Type1"
S1 S2: "Switch", Manufacturer_Name="OMRON Electronics", Mouser Part Number=653-B3U-1000P, Arrow Part Number=B3U-1000P, Arrow Price/Stock=https://www.arrow.com/en/products/b3u1000p/omron.html?utm_currency=USD&region=nac, Datasheet Link=https://www.omron.com/ecb/products/pdf/en-b3u.pdf, Manufacturer_Part_Number=B3U-1000P, Mouser Price/Stock=https://www.mouser.co.uk/ProductDetail/Omron-Electronics/B3U-1000P?qs=AO7BQMcsEu4ip80xyf2FwA%3D%3D
S3: "Toggle Switches 5*2.75mm RoHS", Manufacturer_Name="Korean Hroparts Elec", Datasheet Link=https://datasheet.lcsc.com/szlcsc/Korean-Hroparts-Elec-K3-1293S-E2_C145852.pdf, Geometry.Height=1.4mm, Manufacturer_Part_Number=K3-1292M
S4: "Single-Pole, Double-Throw Analog Switch", Manufacturer_Name="Texas Instruments", Mouser Part Number=595-SN74LVC1G3157DRL, Datasheet Link=http://www.ti.com/lit/gpn/sn74lvc1g3157, Geometry.Height=0.6mm, Manufacturer_Part_Number=SN74LVC1G3157DRLR, Mouser Price/Stock=https://www.mouser.co.uk/ProductDetail/Texas-Instruments/SN74LVC1G3157DRLR?qs=PVVDbbWpW3LmfSj83Os0NA%3D%3D
U1: "Espressif Systems [ENGINEERING SAMPLES]SMD IC , Dual-Core MCU, Wi-Fi 2.4G & BLE 5.0 combo, 8 MB Octal SPI PSRAM", Manufacturer_Name="Espressif Systems", Mouser Part Number=356-ESP32-S3FN8, Datasheet Link=https://www.espressif.com/sites/default/files/documentation/esp32-s3_datasheet_en.pdf, Geometry.Height=0.9mm, Manufacturer_Part_Number=ESP32-S3FN8, Mouser Price/Stock=https://www.mouser.co.uk/ProductDetail/Espressif-Systems/ESP32-S3FN8?qs=Rp5uXu7WBW%2F4Oihh5tkiVQ%3D%3D
U2: "Power Switch ICs - Power Distribution 1A Slew Rate Ctrl Load Switch", Manufacturer_Name=Vishay, Mouser Part Number=781-SIP32431DNP3-GE4, Arrow Part Number=SIP32431DNP3-T1GE4, Arrow Price/Stock=https://www.arrow.com/en/products/sip32431dnp3-t1ge4/vishay?utm_currency=USD&region=nac, Datasheet Link=https://www.vishay.com/docs/66597/sip32431.pdf, Geometry.Height=0.6mm, Manufacturer_Part_Number=SIP32431DNP3-T1GE4, Mouser Price/Stock=https://www.mouser.co.uk/ProductDetail/Vishay-Semiconductors/SIP32431DNP3-T1GE4?qs=FfLXECYddQQ0YorCqBSrEw%3D%3D
U3: "Remote 8-Bit I2C and Low-Power I/O Expander With Interrupt Output and Configuration Registers", Manufacturer_Name="Texas Instruments", Mouser Part Number=595-PCA9534ARGTR, Datasheet Link=http://www.ti.com/lit/ds/symlink/pca9534a.pdf, Geometry.Height=1mm, Manufacturer_Part_Number=PCA9534ARGTR, Mouser Price/Stock=https://www.mouser.co.uk/ProductDetail/Texas-Instruments/PCA9534ARGTR?qs=iSMark9AYDXZsmImREj9BA%3D%3D
U4: "EEPROM 64K 8KX8 1.8V SER EE IND 1/4AWP RPO", Manufacturer_Name=Microchip, Manufacturer_Part_Number=24AA64FT-I/MNY, Mouser Part Number=579-24AA64FT-I/MNY, Datasheet Link=http://www.microchip.com/mymicrochip/filehandler.aspx?ddocname=en541451, Geometry.Height=0.8mm, Mouser Price/Stock=https://www.mouser.co.uk/ProductDetail/Microchip-Technology/24AA64FT-I-MNY?qs=WqWCsLCZBkpYIYo7OoCm1g%3D%3D
U5: "IMUs - Inertial Measurement Units Smart Ultra-Low Power Inertial Measurement Unit (IMU) for Wearable Applications", Manufacturer_Name=BOSCH, Mouser Part Number=262-BMI270, Arrow Part Number=BMI270, Arrow Price/Stock=https://www.arrow.com/en/products/bmi270/bosch-sensortec?utm_currency=USD&region=europe, Datasheet Link=https://www.bosch-sensortec.com/media/boschsensortec/downloads/datasheets/bst-bmi270-ds000.pdf, Geometry.Height=0.87mm, Manufacturer_Part_Number=BMI270, Mouser Price/Stock=https://www.mouser.co.uk/ProductDetail/Bosch-Sensortec/BMI270?qs=u16ybLDytRYIj%252BjQEee88A%3D%3D
U7: "IC; SNSR; DIGITAL; BAROMETRIC PRESSURE SENSOR; LGA8", Manufacturer_Name="Bosch Sensortec", Copyright="Copyright (C) 2026 Ultra Librarian. All rights reserved.", Manufacturer_Part_Number=BMP280, RefDes=RefDes, Type=Type
U8: "Automotive 4.35V to 16V, 1.5A Li-Ion Charger with Power-Path Management for 5.5V Systems", Manufacturer_Name="Texas Instruments", Mouser Part Number=595-BQ24075QRGTRQ1, Datasheet Link=http://www.ti.com/lit/gpn/bq24075-q1, Geometry.Height=1mm, Manufacturer_Part_Number=BQ24075QRGTRQ1, Mouser Price/Stock=https://www.mouser.co.uk/ProductDetail/Texas-Instruments/BQ24075QRGTRQ1?qs=i8JZjLRTtkLLeOPMlhTMpg%3D%3D
U9: "DC DC CONVERTER 0.8-4V", Manufacturer_Name="Delta Electronics", Mouser Part Number=108-MUN3CAD01-SC, Datasheet Link=https://www.cyntec.com/upfile/products/download/Cyntec%20MUN3CAD01-SC_Datasheet%2007.pdf, Geometry.Height=1.05mm, Manufacturer_Part_Number=MUN3CAD01-SC, Mouser Price/Stock=https://www.mouser.co.uk/ProductDetail/Delta-Electronics/MUN3CAD01-SC?qs=t7xnP681wgVWBGFjFLJIqQ%3D%3D
X1: library part ECS-400-10-37B2-CKM-TR, "40 MHz +/-10ppm Crystal 10pF 40 Ohms 4-SMD, No Lead , -20C ~ 70C", Manufacturer_Name=ECS, Mouser Part Number=520-400-10-37B2CKMTR, Datasheet Link=https://ecsxtal.com/store/pdf/ECX-1637B2.pdf, Geometry.Height=0.5mm, Manufacturer_Part_Number=ECS-400-10-37B2-CKM-TR, Mouser Price/Stock=https://www.mouser.co.uk/ProductDetail/ECS/ECS-400-10-37B2-CKM-TR?qs=QNEnbhJQKvYTTE6TC4Pr1w%3D%3D

## Via types
v1: diameter 0.6, hole 0.3, L1 (SIG) to L4 (SIG), tented both sides, 252 vias
v2: diameter 0.5/0.5/0.5/0.5 (per signal layer), hole 0.3, L1 (SIG) to L4 (SIG), tented both sides, 15 vias
v3: diameter 0.6/0.6/0.6/0.6 (per signal layer), hole 0.3, L1 (SIG) to L4 (SIG), tented both sides, 7 vias
v4: diameter 0.5, hole 0.3, L1 (SIG) to L4 (SIG), tented both sides, 2 vias

## Nets (pads, with @x,y where several pads share a name; then routed paths per layer and width w, separated by ;. In a path a pad name is that pad's centre, name@x,y a point inside that pad or via, vN(x,y) a via of type N, cw(c..) or ccw(c..) an arc to the next point about the centre after c; other vN are vias at no path point)
ADC_BAT: C19.2 R15.1 R18.2 U1.9 | length 12.2
  L1 (SIG) w0.2: -8.434,10.42 -8.434,9.934 -8.142,9.642 -4.864,9.642 -4.1,8.879 U1.9@-4.1,8.45
  L1 (SIG) w0.35: v3(-10.325,11.425) -8.825,11.425 -8.434,11.034 -8.434,10.42
  L4 (SIG) w0.35: C19.2@-12.425,11.025 -11.123,11.025 -11.122,11.026 -10.724,11.026 v3(-10.325,11.425)
  L4 (SIG) w0.4: R15.1@-13.453,10.3 -12.675,10.3 -12.441,10.534 -12.441,11.025 C19.2@-12.425,11.025
BUCK_EN: S3.2 U9.1 | length 18.6
  L1 (SIG) w0.2: S3.2@-9.55,-14.95 -8.65,-14.95 -8.2,-14.5 -8.2,-13.7 -6.225,-11.725 v1(-5.625,-11.725) ; v1(1.999,-8.585) 2.024,-8.56 2.024,-7.826 U9.1@2.05,-7.8
  L4 (SIG) w0.2: v1(-5.625,-11.725) -5.55,-11.65 -1.775,-11.65 -0.966,-12.459 1.341,-12.459 2.7,-11.1 2.7,-9.286 v1(1.999,-8.585)
CHIP_EN: C20.2 R17.1 S2.1 U1.4 | length 17.4
  L1 (SIG) w0.2: S2.1@-12,13.8 -11.975,13.775 -10.575,13.775 -10.05,14.3 R17.1@-9.9,14.3 -5.7,14.3 v3(-4.375,12.975) ; U1.4@-2.1,8.45 -2.1,7.83 -1.915,7.645 -1.42,7.645 v2(-1.375,7.6)
  L4 (SIG) w0.2: v3(-4.375,12.975) -4.4,12.95 -4.4,9.275 -3.872,8.747 -2.316,8.747 -1.432,7.864 -1.432,7.657 v2(-1.375,7.6)
E_CS0: J2.9 U1.10 | length 23.5
  L1 (SIG) w0.2: J2.9@-11.3,-7 -11.25,-6.95 -11.25,-5.308 -11,-5.058 v1(-11,-4.95) ; U1.10@-4.5,8.45 -4.5,7.781 -4.25,7.531 v2(-4.25,7.525)
  L4 (SIG) w0.2: v1(-11,-4.95) -11.019,-4.931 -11.019,2.456 -10.619,2.856 -10.619,4.221 -10.976,4.578 -10.976,6.849 -10.075,7.75 -8.905,7.75 -7.73,8.925 -5.65,8.925 v2(-4.25,7.525)
E_CS1: J2.8 U1.11 | length 29.3
  L1 (SIG) w0.2: J2.8@-14.7,-5 -15.9,-5 -16.196,-4.704 -16.196,9.369 -14.76,10.804 -9.452,10.804 -8.986,10.338 -8.986,9.686 -8.525,9.225 -5.075,9.225 -4.9,9.05 U1.11@-4.9,8.45
E_CS2: J2.7 U1.23 | length 9.8
  L1 (SIG) w0.2: J2.7@-11.3,-3 -11.3,-1.975 -9.475,-0.15 -9.475,2.9 -7.975,4.4 U1.23@-6.95,4.4
E_CS3: J2.6 U1.21 | length 12.4
  L1 (SIG) w0.2: J2.6@-14.7,-1 -14.7,-0.275 -14.45,-0.025 -10.35,-0.025 -9.975,0.35 -9.975,3.15 -8.244,4.881 -7.869,4.881 -7.55,5.2 U1.21@-6.95,5.2
E_GPIO1: J3.7 U1.19 | length 40
  L1 (SIG) w0.2: U1.19@-6.95,6 -6.425,6 -6.057,5.632 -6.057,5.307 v2@-6,5.25 ; v1(7.997,-2.586) 7.997,-1.403 9.325,-0.075 13.975,-0.075 14.7,-0.8 J3.7@14.7,-3
  L4 (SIG) w0.2: v2(-6.019,5.25) -6.619,4.65 -6.647,4.65 -8.428,2.869 -8.428,-0.132 -5.258,-3.302 -5.258,-5.154 -4.562,-5.85 2.084,-5.85 4.443,-3.491 7.091,-3.491 v1(7.997,-2.586)
E_GPIO2: J3.8 U1.40 | length 18.4
  L1 (SIG) w0.2: U1.40@-1.7,1.55 -1.7,-0.492 0.918,-3.111 9.339,-3.111 9.825,-2.625 10.676,-2.625 11.325,-3.274 11.325,-4.975 J3.8@11.3,-5
E_MISO: J3.4 U1.22 | length 22
  L1 (SIG) w0.2: U1.22@-6.95,4.8 -6.519,4.8 v2(-6.019,4.3) ; v1(9,2.5) 9.425,2.925 11.225,2.925 J3.4@11.3,3
  L4 (SIG) w0.2: v2(-6.019,4.3) -6.05,4.3 -6.818,3.532 -6.818,2.643 -6.375,2.2 -1.725,2.2 -1.5,1.975 5.65,1.975 6.25,2.575 8.925,2.575 v1(9,2.5)
E_MOSI: J3.5 U1.27 | length 25.8
  L1 (SIG) w0.2: v3(-7.688,1.74) -7.688,2.491 -7.454,2.725 -7.35,2.725 -7.275,2.8 U1.27@-6.95,2.8 ; v1(9.7,1.8) 9.725,1.775 11.083,1.775 11.331,2.023 14.257,2.023 14.548,1.732 14.548,1.152 J3.5@14.7,1
  L4 (SIG) w0.2: v3(-7.688,1.74) -6.465,1.74 -6.3,1.575 3.048,1.575 3.99,0.633 6.183,0.633 6.767,1.216 9.116,1.216 v1(9.7,1.8)
E_OW: J3.6 U1.17 | length 37.3
  L1 (SIG) w0.2: U1.17@-6.95,6.8 -6.475,6.8 v2@-6.025,6.35 ; v1(8.904,-2.213) 10.116,-1 J3.6@11.3,-1
  L4 (SIG) w0.2: v2(-6.019,6.35) -6.492,6.35 -7.658,5.184 -7.658,4.58 -8.953,3.285 -8.953,-0.558 -5.73,-3.781 -5.73,-5.477 -4.257,-6.95 -2.859,-6.95 -1.733,-8.076 0.699,-8.076 1.25,-7.525 1.25,-7.266 2.178,-6.338 2.687,-6.338 4.775,-4.25 7.504,-4.25 8.904,-2.85 v1(8.904,-2.213)
E_RX1: J2.2 U1.14 | length 9.9
  L1 (SIG) w0.2: J2.2@-14.7,7 -14.525,7.175 -14.525,7.7 -14.325,7.9 -11.88,7.9 -9.954,7.9 -9.154,8.7 -6.1,8.7 U1.14@-6.1,8.45
E_RX2: J3.2 U1.6 | length 21.4
  L1 (SIG) w0.2: U1.6@-2.9,8.45 -2.9,7.881 -2.725,7.706 v2(-2.725,7.625) ; v3(3.98,3.836) 4.602,3.836 6.113,2.325 7.7,2.325 9.299,3.924 9.299,6.499 9.6,6.8 11.1,6.8 J3.2@11.2,6.9
  L4 (SIG) w0.2: v2(-2.725,7.625) -2.725,6.075 -2.15,5.5 1.05,5.5 2.181,4.369 3.555,4.369 3.98,3.945 v3(3.98,3.836)
E_SCL: J2.5 R1.1 U1.18 | length 9.9
  L1 (SIG) w0.2: J2.5@-11.3,1 R1.1@-11.3,2.4 -10.675,2.4 -10.5,2.575 -10.5,3.475 -10.013,3.962 -10.013,6.371 -9.765,6.618 -9.095,6.618 -8.662,7.052 -8.048,7.052 -7.396,6.4 U1.18@-6.95,6.4
E_SCLK: J3.3 U1.24 | length 23.9
  L1 (SIG) w0.2: U1.24@-6.95,4 -6.5,4 -6.012,3.512 v2@-6.012,3.137 ; v1(10.4,4.075) 10.477,3.998 10.707,3.998 10.717,3.988 13.967,3.988 14.296,4.317 14.296,4.602 14.694,5 J3.3@14.7,5
  L4 (SIG) w0.2: v2(-6.019,3.125) -5.938,3.125 -5.663,2.85 0.15,2.85 0.625,2.375 5.112,2.375 5.953,3.216 9.491,3.216 10.35,4.075 v1(10.4,4.075)
E_SDA: J2.4 R2.1 U1.15 | length 11.7
  L1 (SIG) w0.2: J2.4@-14.7,3 -14.625,3.075 R2.1@-14.625,5 -14.625,5.675 -14.325,5.975 -12.544,5.975 -11.037,7.481 -9.694,7.481 -8.915,8.26 -8.052,8.26 -7.392,7.6 U1.15@-6.95,7.6
E_TX1: J2.3 U1.16 | length 6.4
  L1 (SIG) w0.2: J2.3@-11.3,5 -11.3,6.414 -10.655,7.059 -9.366,7.059 -8.794,7.631 -8.048,7.631 -7.617,7.2 U1.16@-6.95,7.2
E_TX2: J3.1 U1.47 | length 22.9
  L1 (SIG) w0.2: v2(-0.95,3.95) -0.9,4 U1.47@-0.05,4 ; v1(10.35,8.895) 11.204,8.041 14.521,8.041 14.7,8.22 J3.1@14.7,9
  L4 (SIG) w0.2: v2(-0.95,3.95) -0.467,3.467 0.262,3.467 0.954,2.775 4.614,2.775 5.605,3.765 8.865,3.765 10.361,5.261 10.361,7.695 10.355,7.701 10.355,8.89 v1(10.35,8.895)
ESP_LNA: C3.2 L2.2 U1.1 | length 3.7
  L1 (SIG) w0.2: U1.1@-0.902,8.452 U1.1@-0.902,8.864
  L1 (SIG) w0.35: -0.902,8.912 -0.902,9.201 ; -0.902,9.276 cw(c-0.425,9.276) -0.762,9.613 -0.325,10.05 ; -0.325,10.05 ccw(c-1.13,10.855) 0.004,10.755 C3.2@0.007,10.909 ; C3.2@0,10.925 L2.2@0,11.975